# Altium PCB body_2024-07-18.pcbdoc (part 1 of 2)
Units mil, origin at the board's own origin, x right, y up, seen from the top; angles counter-clockwise.
Board outline 1175 x 6265 mil, 4 copper layers (Top Layer, Layer 1, Layer 2, Bottom Layer), stack 23.756 mil thick; 104 components, 187 nets, 571 pads, 148 vias.
Unrouted connection lines stored in the file: 11.
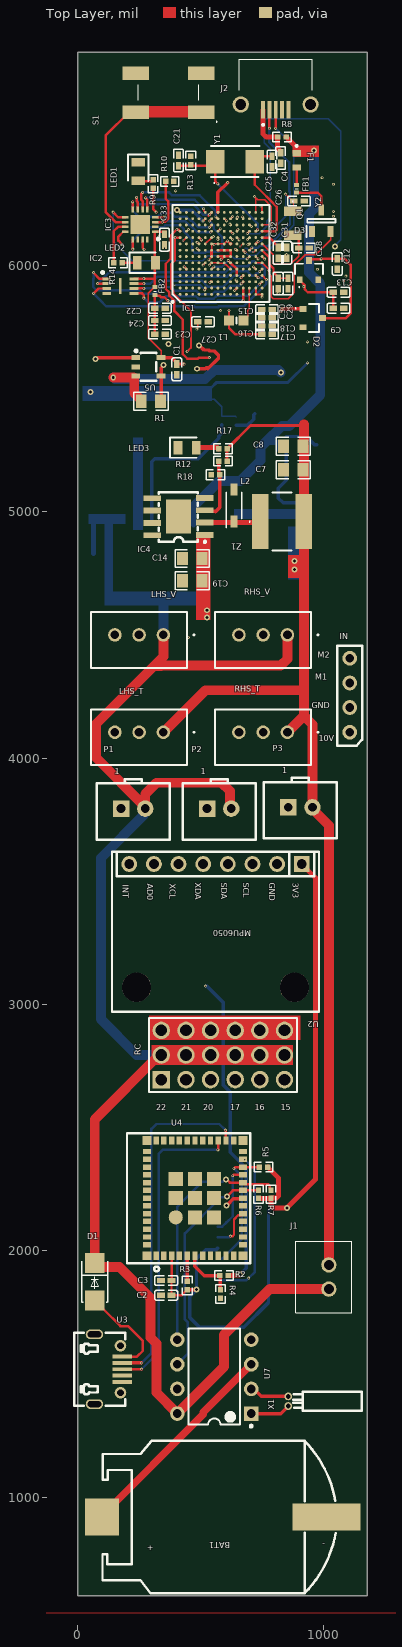
[diagram p0: Top Layer view]
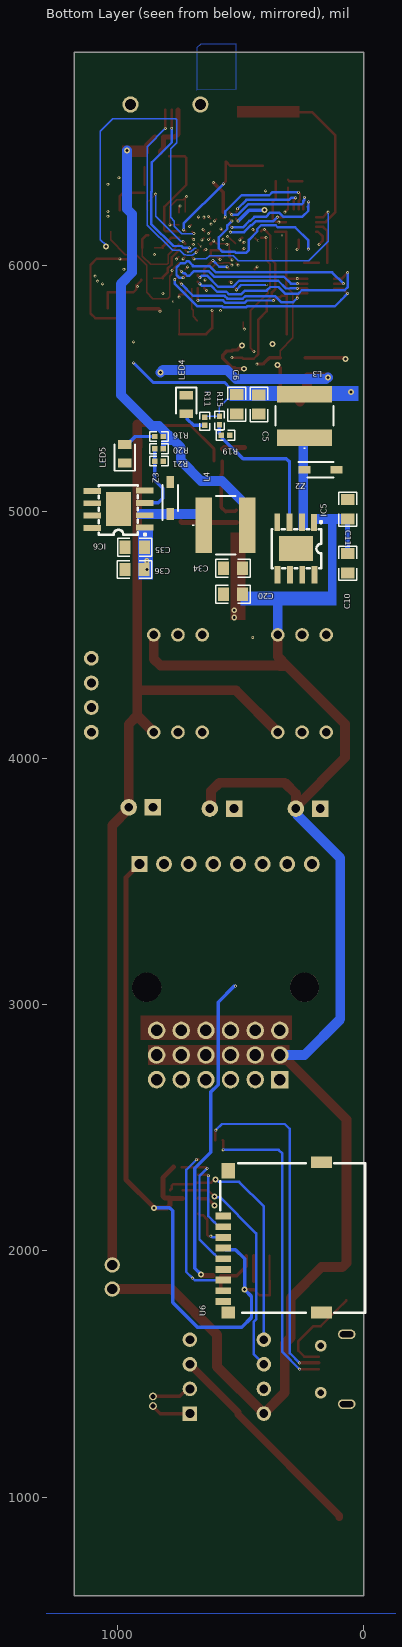
[diagram p1: Bottom Layer view, seen from below]
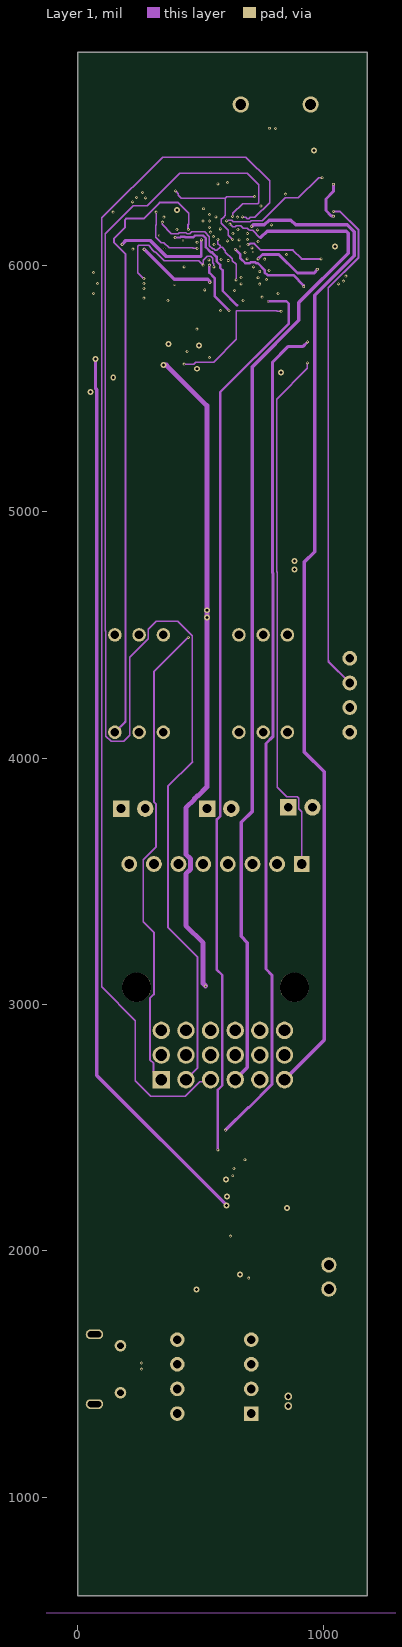
[diagram p2: Layer 1]
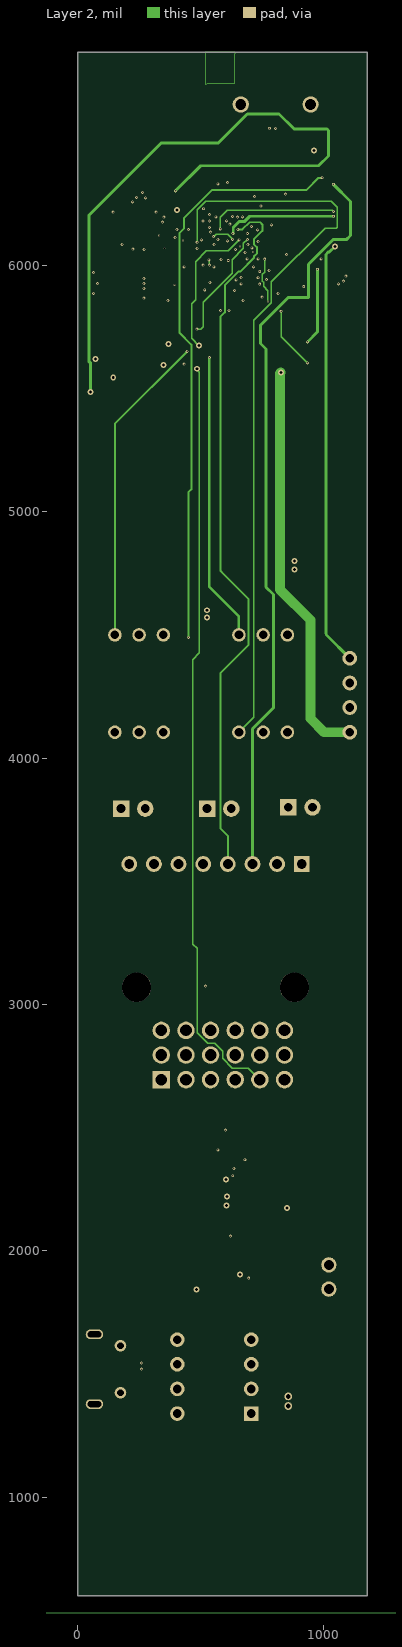
[diagram p3: Layer 2]

## Layer stack, top to bottom
Top Solder: solder mask 0.4, Solder Resist, Dk 3.5
Top Layer: signal copper 1.4
Dielectric 1: prepreg 2.8, PP-006, Dk 4.1
Layer 1: signal copper 1.378
Dielectric1: dielectric 12.6, FR-4, Dk 4.8
Layer 2: signal copper 1.378
Dielectric 2: prepreg 2.8, PP-006, Dk 4.1
Bottom Layer: signal copper 1.4
Bottom Solder: solder mask 0.4, Solder Resist, Dk 3.5

## Board outline
0,5605 0,6865 1175,6865 1175,600 0,600

## Design rules (kind name [scope] priority, off if disabled: settings)
AssemblyTestPointUsage [All] p0: scope1count=1 scope1_0_kind=Board scope1_0_value=Board scope2count=1 scope2_0_kind=Board scope2_0_value=Board commentlength=0
AssemblyTestpoint [All] p0: scope1count=1 scope1_0_kind=Board scope1_0_value=Board scope2count=1 scope2_0_kind=Board scope2_0_value=Board commentlength=0
BoardOutlineClearance [All] p0: scope1count=1 scope1_0_kind=Board scope1_0_value=Board scope2count=1 scope2_0_kind=Board scope2_0_value=Board commentlength=0 gap=10
BoardOutlineClearance [All] p1: gap=10 ignorepadtopadclearanceinfootprint=FALSE except(0: Arc-SplitContinuation Track-SplitContinuation SMDPad-SplitContinuation THPad-SplitContinuation Via-SplitContinuation Fill-SplitContinuation Poly-SplitContinuation Region-SplitContinuation Text-SplitContinuation; 40: Arc-OutlineEdge Track-OutlineEdge SMDPad-OutlineEdge THPad-OutlineEdge Via-OutlineEdge Fill-OutlineEdge Poly-OutlineEdge Region-OutlineEdge Text-OutlineEdge)
Clearance [All] p0: scope1count=1 scope1_0_kind=Board scope1_0_value=Board scope2count=1 scope2_0_kind=Board scope2_0_value=Board commentlength=0 gap=7
Clearance [All] p1: gap=7 ignorepadtopadclearanceinfootprint=FALSE
ComponentClearance [All] p0: scope1count=1 scope1_0_kind=Board scope1_0_value=Board scope2count=1 scope2_0_kind=Board scope2_0_value=Board commentlength=0 gap=10 collisioncheckmode=3
DiffPairsRouting [All] p0: scope1count=1 scope1_0_kind=Board scope1_0_value=Board scope2count=1 scope2_0_kind=Board scope2_0_value=Board commentlength=0
FabricationTestPointUsage [All] p0: scope1count=1 scope1_0_kind=Board scope1_0_value=Board scope2count=1 scope2_0_kind=Board scope2_0_value=Board commentlength=0 valid=0 allowmultiple=FALSE
FabricationTestpoint [All] p0: scope1count=1 scope1_0_kind=Board scope1_0_value=Board scope2count=1 scope2_0_kind=Board scope2_0_value=Board commentlength=0 side=3 testpointundercomponent=TRUE minsize=40 maxsize=100 preferedsize=60 minholesize=0 maxholesize=40 preferedholesize=32 testpointgrid=1
FanoutControl Fanout_BGA [All] p0 off: scope1count=1 scope1_0_kind=Board scope1_0_value=Board scope2count=1 scope2_0_kind=Board scope2_0_value=Board commentlength=69 // Protel DXP Scope 1 Expression Was: IsBGA   Fanout_BGA (Default Rule)
FanoutControl Fanout_LCC [All] p0 off: scope1count=1 scope1_0_kind=Board scope1_0_value=Board scope2count=1 scope2_0_kind=Board scope2_0_value=Board commentlength=69 // Protel DXP Scope 1 Expression Was: IsLCC   Fanout_LCC (Default Rule)
FanoutControl Fanout_SOIC [All] p0 off: scope1count=1 scope1_0_kind=Board scope1_0_value=Board scope2count=1 scope2_0_kind=Board scope2_0_value=Board commentlength=71 // Protel DXP Scope 1 Expression Was: IsSOIC   Fanout_SOIC (Default Rule)
FanoutControl Fanout_Small [All] p0 off: scope1count=1 scope1_0_kind=Board scope1_0_value=Board scope2count=1 scope2_0_kind=Board scope2_0_value=Board commentlength=84 // Protel DXP Scope 1 Expression Was: (CompPinCount < 5)   Fanout_Small (Default Rule)
FanoutControl Fanout_Default [All] p0: scope1count=1 scope1_0_kind=Board scope1_0_value=Board scope2count=1 scope2_0_kind=Board scope2_0_value=Board commentlength=30 // Fanout_Default (Default Rule)
Height [All] p0: scope1count=1 scope1_0_kind=Board scope1_0_value=Board scope2count=1 scope2_0_kind=Board scope2_0_value=Board commentlength=0
HoleSize [All] p0: scope1count=1 scope1_0_kind=Board scope1_0_value=Board scope2count=1 scope2_0_kind=Board scope2_0_value=Board commentlength=0 absolutevalues=TRUE maxlimit=100 minlimit=1 maxpercent=80.000 minpercent=20.000
HoleToHoleClearance [All] p0: scope1count=1 scope1_0_kind=Board scope1_0_value=Board scope2count=1 scope2_0_kind=Board scope2_0_value=Board commentlength=0
LayerPairs [All] p0: scope1count=1 scope1_0_kind=Board scope1_0_value=Board scope2count=1 scope2_0_kind=Board scope2_0_value=Board commentlength=0 enforce=TRUE
MinimumSolderMaskSliver [All] p0: scope1count=1 scope1_0_kind=Board scope1_0_value=Board scope2count=1 scope2_0_kind=Board scope2_0_value=Board commentlength=0
NetAntennae [All] p0: scope1count=1 scope1_0_kind=Board scope1_0_value=Board scope2count=1 scope2_0_kind=Board scope2_0_value=Board commentlength=0
PasteMaskExpansion [All] p0: scope1count=1 scope1_0_kind=Board scope1_0_value=Board scope2count=1 scope2_0_kind=Board scope2_0_value=Board commentlength=0 expansion=0
PlaneClearance [All] p0: scope1count=1 scope1_0_kind=Board scope1_0_value=Board scope2count=1 scope2_0_kind=Board scope2_0_value=Board commentlength=0 clearance=20
PlaneConnect [All] p0: scope1count=1 scope1_0_kind=Board scope1_0_value=Board scope2count=1 scope2_0_kind=Board scope2_0_value=Board commentlength=0 planeconnectstyle=Relief reliefexpansion=20 reliefentries=4 reliefconductorwidth=10 reliefairgap=10
PolygonConnect [All] p0: scope1count=1 scope1_0_kind=Board scope1_0_value=Board scope2count=1 scope2_0_kind=Board scope2_0_value=Board commentlength=0 connectstyle=Direct reliefconductorwidth=10 reliefentries=4 polygonreliefangle="90 Angle"
PolygonConnect [All] p1: connectstyle=Direct reliefconductorwidth=10 reliefentries=4 polygonreliefangle="90 Angle" airgapwidth=10
RoutingCorners [All] p0: scope1count=1 scope1_0_kind=Board scope1_0_value=Board scope2count=1 scope2_0_kind=Board scope2_0_value=Board commentlength=0 cornerstyle=45-Degree minsetback=100 maxsetback=100
RoutingLayers [All] p0: scope1count=1 scope1_0_kind=Board scope1_0_value=Board scope2count=1 scope2_0_kind=Board scope2_0_value=Board commentlength=0 top layer=Automatic mid layer 1=Automatic mid layer 2=Automatic bottom layer=Automatic
RoutingPriority [All] p0: scope1count=1 scope1_0_kind=Board scope1_0_value=Board scope2count=1 scope2_0_kind=Board scope2_0_value=Board commentlength=0
RoutingTopology [All] p0: scope1count=1 scope1_0_kind=Board scope1_0_value=Board scope2count=1 scope2_0_kind=Board scope2_0_value=Board commentlength=0 topology=Shortest
RoutingVias [All] p0: scope1count=1 scope1_0_kind=Board scope1_0_value=Board scope2count=1 scope2_0_kind=Board scope2_0_value=Board commentlength=0 holewidth=6 width=12 viastyle="Through Hole" minholewidth=5 minwidth=8 maxholewidth=12 maxwidth=24
RoutingVias [All] p1: holewidth=6 width=12 viastyle="Through Hole" minholewidth=5 minwidth=8 maxholewidth=12 maxwidth=24
ShortCircuit [All] p0: scope1count=1 scope1_0_kind=Board scope1_0_value=Board scope2count=1 scope2_0_kind=Board scope2_0_value=Board commentlength=0 allowed=FALSE
SilkToBoardRegionClearance [All] p0: scope1count=1 scope1_0_kind=Board scope1_0_value=Board scope2count=1 scope2_0_kind=Board scope2_0_value=Board commentlength=0
SilkToSilkClearance [All] p0: scope1count=1 scope1_0_kind=Board scope1_0_value=Board scope2count=1 scope2_0_kind=Board scope2_0_value=Board commentlength=0
SilkToSolderMaskClearance [All] p0 off: scope1count=1 scope1_0_kind=Board scope1_0_value=Board scope2count=1 scope2_0_kind=Board scope2_0_value=Board commentlength=44 // Protel DXP Scope 1 Expression Was: IsPad
SolderMaskExpansion [All] p0: scope1count=1 scope1_0_kind=Board scope1_0_value=Board scope2count=1 scope2_0_kind=Board scope2_0_value=Board commentlength=0 expansion=4
SolderMaskExpansion [All] p1: expansion=4 istentingtop=FALSE
UnRoutedNet [All] p0: scope1count=1 scope1_0_kind=Board scope1_0_value=Board scope2count=1 scope2_0_kind=Board scope2_0_value=Board commentlength=0
UnpouredPolygon [All] p0: scope1count=1 scope1_0_kind=Board scope1_0_value=Board scope2count=1 scope2_0_kind=Board scope2_0_value=Board commentlength=0
Width [All] p0: scope1count=1 scope1_0_kind=Board scope1_0_value=Board scope2count=1 scope2_0_kind=Board scope2_0_value=Board commentlength=0 maxlimit=100 minlimit=6 preferedwidth=12
Width [All] p1: maxlimit=100 minlimit=6 preferedwidth=12
30 further rules are at their usual default settings.

## Classes and differential pairs
component class Teensy: C4 C9 C12 C13 C15 C16 C17 C18 C21 C22 C23 C24 C25 C26 C27 C28 C29 C30 C31 C32 C33 D2 D3 F1 FB1 FB2 IC1 IC2 IC3 J2 L1 LED1 LED2 Q1 R8 R9 R10 R13 R14 S1 Y1 Y2
component class Buck_converter: C5 C6 C7 C8 C10 C11 C14 C19 C20 C34 C35 C36 IC4 IC5 IC6 L2 L3 L4 LED3 LED4 LED5 R11 R12 R15 R16 R17 R18 R19 R20 R21 Z1 Z2 Z3
component class Sheet_1_2024-07-17: BAT1 C1 C2 C3 D1 IN J1 LHS_T LHS_V P1 P2 P3 R1 R2 R3 R4 R5 R6 R7 RC RHS_T RHS_V U2 U3 U4 U5 U6 U7 X1

## Components (designator, comment, footprint, x,y, rotation, side; value= is the part's Value field where it differs from the comment)
BAT1 "BS-CR2032-8" BAT-SMD_BS-CR2032-8 555,920 r180 top
C1 "0402B104K250CT" C0402#1 403.04,5577.64 r90 top
C2 "0402B104K250CT" C0402#2 360,1820 r0 top
C3 "0402X106M6R3NT" C0402#2 360,1880 r180 top
C4 "Cap" C0402#1 824.32,6435.41 r90 top
C5 "C1711" C0805 425,5435 r90 bottom
C6 "C86816" C0805 515,5435.63 r90 bottom
C7 "C1711" C0805 875,5170 r0 top
C8 "C86816" C0805 875,5265 r0 top
C9 "Cap" C0402#1 1059.32,5825.41 r180 top
C10 "C1711" C0805 65,4790 r90 bottom
C11 "C86816" C0805 65,5010 r270 bottom
C12 "Cap" C0402#1 1054.32,6005.41 r90 top
C13 "Cap" C0402#1 1059.32,5890.41 r180 top
C14 "C1711" C0805 465,4810 r0 top
C15 "Cap" C0402#1 769.32,5820.41 r180 top
C16 "Cap" C0402#1 769.32,5787.08 r180 top
C17 "Cap" C0402#1 769.32,5753.74 r180 top
C18 "Cap" C0402#1 769.32,5720.41 r180 top
C19 "C86816" C0805 465,4720 r0 top
C20 "C1711" C0805 530,4665 r180 bottom
C21 "Cap" C0402#1 409.32,6425.41 r270 top
C22 "Cap" C0402#1 334.32,5825.41 r180 top
C23 "Cap" C0402#1 334.32,5720.41 r180 top
C24 "Cap" C0402#1 334.32,5775.41 r180 top
C25 "Cap" C0402#1 789.32,6420.41 r90 top
C26 "Cap" C0402#1 899.32,6260.41 r180 top
C27 "Cap" C0402#1 509.32,5770.41 r180 top
C28 "Cap" C0402#1 919.32,6070.41 r180 top
C29 "Cap" C0402#1 854.32,5925.41 r90 top
C30 "Cap" C0402#1 814.32,5925.41 r90 top
C31 "Cap" C0402#1 849.32,6050.41 r90 top
C32 "Cap" C0402#1 814.32,6050.41 r90 top
C33 "Cap" C0402#1 353.04,6103.74 r270 top
C34 "C86816" C0805 530,4770 r180 bottom
C35 "C1711" C0805 929.37,4855 r180 bottom
C36 "C86816" C0805 930,4765 r180 bottom
D1 "SS34-MS" DO-214AC_L4.3-W2.7-LS5.0-RD 70,1875 r270 top
D2 "BAT54C,215" BAT54C215 954.32,5785.41 r270 top
D3 "BAT54C,215" BAT54C215 939.32,5980.41 r0 top
F1 "ERB-RE0R50V" ERBRE0R50V 889.32,6425.41 r270 top
FB1 "BLM15AG601SN1D" NFZ15SG152SN10B 889.32,6310.41 r270 top
FB2 "BLM15AG601SN1D" NFZ15SG152SN10B 314.32,5895.41 r90 top
IC1 "MIMXRT1062DVL6B" BGA196C65P14X14_1000X1000X152 582.71,6048.21 r90 top
IC2 "W25Q16JVUXIM" SON50P300X200X60-9N 174.32,5915.41 r0 top
IC3 "MKL02Z32VFG4" QFN50P300X300X65-17N-D 254.32,6165.41 r180 top
IC4 "LM2596HVGDP-ADJ" SOP-8-PP_L4.9-W3.9-P1.27-LS6.0-BL-EP 410,4980 r90 top
IC5 "LM2596HVGDP-ADJ" SOP-8-PP_L4.9-W3.9-P1.27-LS6.0-BL-EP 275,4850.01 r0 bottom
IC6 "LM2596HVGDP-ADJ" SOP-8-PP_L4.9-W3.9-P1.27-LS6.0-BL-EP 994.99,5010 r90 bottom
IN "ESC Input" PINS1X4 1105,4255 r90 top
J1 "B2B-XH-2__LF__SN_" B2BXH2LFSN 1020,1845 r90 top
J2 "U-F-M5WD-W-1" UFM5WDW1 804.32,6595.41 r0 top
L1 "CBMF1608T4R7M" INDC1608X100N 644.32,5775.41 r180 top
L2 "SWPA6045S680MT" SWPA6045S680MT 830,4960 r0 top
L3 "SWPA6045S680MT" SWPA6045S680MT 240,5388.58 r90 bottom
L4 "SWPA6045S680MT" SWPA6045S680MT 560,4945 r180 bottom
LED1 "150080BS75000" LEDC2012X80N 246.92,6380.41 r270 top
LED2 "150080BS75000" LEDC2012X80N 279.32,6010.41 r0 top
LED3 "150080BS75000" LEDC2012X80N 445,5260 r0 top
LED4 "150080BS75000" LEDC2012X80N 720,5435 r270 bottom
LED5 "150080BS75000" LEDC2012X80N 970,5235 r90 bottom
LHS_T "B3B-XH-A_LF__SN_" B3BXHALFSN 348.43,4105 r180 top
LHS_V "B3B-XH-A_LF__SN_" B3BXHALFSN 348.43,4500 r180 top
P1 "C18185649" HDR-TH_2P-P2.50-V-F-1 225.79,3795 r0 top
P2 "C18185649" HDR-TH_2P-P2.50-V-F-1 575,3795 r0 top
P3 "C18185649" HDR-TH_2P-P2.50-V-F-1 904.21,3800 r0 top
Q1 "DMG2305UX" SOT96P240X115-3N 989.32,6180.41 r90 top
R1 "RLM10FTSMR006" R0805 298.04,5447.64 r0 top
R2 "SCR0402F10K" R0402#1 595,1900 r0 top
R3 "SCR0402F10K" R0402#1 445,1860 r270 top
R4 "RMC04022K1%N" R0402#1 580,1825 r90 top
R5 "SCR0402F10K" R0402#1 755,2340 r0 top
R6 "SCR0402F10K" R0402#1 735,2230 r270 top
R7 "SCR0402F10K" R0402#1 785,2230 r270 top
R8 "Res1" R0402#2 829.32,6520.41 r0 top
R9 "Res1" R0402#2 306.92,6330.41 r270 top
R10 "Res1" R0402#2 374.32,6340.41 r180 top
R11 "1k" R0402#2 645,5367.04 r90 bottom
R12 "29.15k" R0402#2 590,5205 r180 top
R13 "Res1" R0402#2 459.32,6425.41 r270 top
R14 "Res1" R0402#2 164.32,6010.41 r0 top
R15 "3.4K" R0402#2 585,5370 r270 bottom
R16 "1k" R0402#2 830,5305 r180 bottom
R17 "1k" R0402#2 590,5255 r0 top
R18 "5k" R0402#2 560,5150 r0 top
R19 "2K" R0402#2 560,5310 r180 bottom
R20 "3K" R0402#2 830,5255 r0 bottom
R21 "1k" R0402#2 830,5205 r0 bottom
RC "Receiver" HEADER_PINS_3X6_2.54MM 340,2695 r90 top
RHS_T "B3B-XH-A_LF__SN_" B3BXHALFSN 851.85,4105 r180 top
RHS_V "B3B-XH-A_LF__SN_" B3BXHALFSN 851.85,4500 r180 top
S1 "SKHUBHE010" SKHUBHE010 369.32,6700.41 r180 top
U2 "MPU6050 MODULE" MPU6050 750,3270 r180 top
U3 "HX MICRO XNJ JB" MICRO-USB-SMD_MICRONJ5P-1.0-1.25 125,1520 r270 top
U4 "ESP32-C3-MINI-1U-H4" WIFIM-SMD_ESP32-C3-MINI-MINI-1U 476.5,2214.24 r90 top
U5 "ZXCT1086E5TA" SOT-25_L3.0-W1.6-P0.95-LS2.8-BR 288.04,5587.64 r180 top
U6 "HX TF-CARD H1.8" TF-SMD_HX-TF-CARD-H1.8 370,2055 r90 bottom
U7 "DS1307N" DIP-8_L9.8-W6.6-P2.54-LS7.6-BL 555,1490 r90 top
X1 "DT-26 32.768KHz" OSC-TH_BD2.0-P0.70-D0.3 855,1390 r180 top
Y1 "ABM3-24.000MHZ-D2Y-T" ABM3 639.32,6420.41 r0 top
Y2 "Q13FC1350000300" Q13FC1350000300 874.32,6170.41 r270 top
Z1 "BZT52C10" SOD3716X125N 635,5025 r90 top
Z2 "BZT52C10" SOD3716X125N 175,5170 r180 bottom
Z3 "BZT52C10" SOD3716X125N 785,5055 r90 bottom

## Footprints (in the part's own frame and the unit in brackets; to place one, negate y for a bottom-side part, rotate by r counter-clockwise, add the part's x,y. Pads: shape width x height; smd on the part's side, far side on the other; paste and mask are expansions set on the pad)
ABM3 [mm]
  rect 1.9x2.4 smd: 1(-2.05,0) 2(2.05,0)
  silkscreen extent -2.5,-2.25 2.5,1.6
B2BXH2LFSN [mm]
  round 1.575 hole 1.05: 1(0,0) 2(2.5,0)
  silkscreen extent -2.45,-2.35 4.95,3.4
B3BXHALFSN [mm]
  round 1.4 hole 0.9: 1(0,0) 2(2.5,0) 3(5,0)
  silkscreen extent -3.2,-2.35 7.45,3.4
BAT54C215 [mm]
  rect 0.6x0.7 smd: 1(-0.95,-1) 2(0.95,-1) 3(0,1)
  silkscreen extent -1.45,-1.8 1.45,0.65
BAT-SMD_BS-CR2032-8 [mm]
  rect 7x2.8 smd: 1(-11.575,0)
  rect 3.5x3.8 smd: 2(11.575,0)
  silkscreen extent -12.52,-7.85 11.52,7.85
BGA196C65P14X14_1000X1000X152 [mm]
  round 0.29 smd: A1(-4.225,4.225) A2(-3.575,4.225) A3(-2.925,4.225) A4(-2.275,4.225) A5(-1.625,4.225) A6(-0.975,4.225) A7(-0.325,4.225) A8(0.325,4.225) A9(0.975,4.225) A10(1.625,4.225) A11(2.275,4.225) A12(2.925,4.225) A13(3.575,4.225) A14(4.225,4.225) B1(-4.225,3.575) B2(-3.575,3.575) B3(-2.925,3.575) B4(-2.275,3.575) B5(-1.625,3.575) B6(-0.975,3.575) B7(-0.325,3.575) B8(0.325,3.575) B9(0.975,3.575) B10(1.625,3.575) B11(2.275,3.575) B12(2.925,3.575) B13(3.575,3.575) B14(4.225,3.575) C1(-4.225,2.925) C2(-3.575,2.925) C3(-2.925,2.925) C4(-2.275,2.925) C5(-1.625,2.925) C6(-0.975,2.925) C7(-0.325,2.925) C8(0.325,2.925) C9(0.975,2.925) C10(1.625,2.925) C11(2.275,2.925) C12(2.925,2.925) C13(3.575,2.925) C14(4.225,2.925) D1(-4.225,2.275) D2(-3.575,2.275) D3(-2.925,2.275) D4(-2.275,2.275) D5(-1.625,2.275) D6(-0.975,2.275) D7(-0.325,2.275) D8(0.325,2.275) D9(0.975,2.275) D10(1.625,2.275) D11(2.275,2.275) D12(2.925,2.275) D13(3.575,2.275) D14(4.225,2.275) E1(-4.225,1.625) E2(-3.575,1.625) E3(-2.925,1.625) E4(-2.275,1.625) E5(-1.625,1.625) E6(-0.975,1.625) E7(-0.325,1.625) E8(0.325,1.625) E9(0.975,1.625) E10(1.625,1.625) E11(2.275,1.625) E12(2.925,1.625) E13(3.575,1.625) E14(4.225,1.625) F1(-4.225,0.975) F2(-3.575,0.975) F3(-2.925,0.975) F4(-2.275,0.975) F5(-1.625,0.975) F6(-0.975,0.975) F7(-0.325,0.975) F8(0.325,0.975) F9(0.975,0.975) F10(1.625,0.975) F11(2.275,0.975) F12(2.925,0.975) F13(3.575,0.975) F14(4.225,0.975) G1(-4.225,0.325) G2(-3.575,0.325) G3(-2.925,0.325) G4(-2.275,0.325) G5(-1.625,0.325) G6(-0.975,0.325) G7(-0.325,0.325) G8(0.325,0.325) G9(0.975,0.325) G10(1.625,0.325) G11(2.275,0.325) G12(2.925,0.325) G13(3.575,0.325) G14(4.225,0.325) H1(-4.225,-0.325) H2(-3.575,-0.325) H3(-2.925,-0.325) H4(-2.275,-0.325) H5(-1.625,-0.325) H6(-0.975,-0.325) H7(-0.325,-0.325) H8(0.325,-0.325) H9(0.975,-0.325) H10(1.625,-0.325) H11(2.275,-0.325) H12(2.925,-0.325) H13(3.575,-0.325) H14(4.225,-0.325) J1(-4.225,-0.975) J2(-3.575,-0.975) J3(-2.925,-0.975) J4(-2.275,-0.975) J5(-1.625,-0.975) J6(-0.975,-0.975) J7(-0.325,-0.975) J8(0.325,-0.975) J9(0.975,-0.975) J10(1.625,-0.975) J11(2.275,-0.975) J12(2.925,-0.975) J13(3.575,-0.975) J14(4.225,-0.975) K1(-4.225,-1.625) K2(-3.575,-1.625) K3(-2.925,-1.625) K4(-2.275,-1.625) K5(-1.625,-1.625) K6(-0.975,-1.625) K7(-0.325,-1.625) K8(0.325,-1.625) K9(0.975,-1.625) K10(1.625,-1.625) K11(2.275,-1.625) K12(2.925,-1.625) K13(3.575,-1.625) K14(4.225,-1.625) L1(-4.225,-2.275) L2(-3.575,-2.275) L3(-2.925,-2.275) L4(-2.275,-2.275) L5(-1.625,-2.275) L6(-0.975,-2.275) L7(-0.325,-2.275) L8(0.325,-2.275) L9(0.975,-2.275) L10(1.625,-2.275) L11(2.275,-2.275) L12(2.925,-2.275) L13(3.575,-2.275) L14(4.225,-2.275) M1(-4.225,-2.925) M2(-3.575,-2.925) M3(-2.925,-2.925) M4(-2.275,-2.925) M5(-1.625,-2.925) M6(-0.975,-2.925) M7(-0.325,-2.925) M8(0.325,-2.925) M9(0.975,-2.925) M10(1.625,-2.925) M11(2.275,-2.925) M12(2.925,-2.925) M13(3.575,-2.925) M14(4.225,-2.925) N1(-4.225,-3.575) N2(-3.575,-3.575) N3(-2.925,-3.575) N4(-2.275,-3.575) N5(-1.625,-3.575) N6(-0.975,-3.575) N7(-0.325,-3.575) N8(0.325,-3.575) N9(0.975,-3.575) N10(1.625,-3.575) N11(2.275,-3.575) N12(2.925,-3.575) N13(3.575,-3.575) N14(4.225,-3.575) P1(-4.225,-4.225) P2(-3.575,-4.225) P3(-2.925,-4.225) P4(-2.275,-4.225) P5(-1.625,-4.225) P6(-0.975,-4.225) P7(-0.325,-4.225) P8(0.325,-4.225) P9(0.975,-4.225) P10(1.625,-4.225) P11(2.275,-4.225) P12(2.925,-4.225) P13(3.575,-4.225) P14(4.225,-4.225)
  silkscreen extent -5.1,-5 5,5.1
C0402#1 [mm]
  rect 0.79x0.54 smd paste-100 mask+0.051: 1(-0.545,0) 2(0.545,0)
  silkscreen extent -1.17,-0.5 1.17,0.5
C0402#2 [mm]
  rect 0.79x0.54 smd paste-100 mask+0: 1(-0.545,0) 2(0.545,0)
  silkscreen extent -1.17,-0.5 1.17,0.5
C0805 [mm]
  rect 1.133x1.377 smd paste-100 mask+0.051: 1(-1,0) 2(1,0)
  silkscreen extent -1.76,-0.92 1.76,0.92
DIP-8_L9.8-W6.6-P2.54-LS7.6-BL [mm]
  rect 1.5x1.5 hole 0.9 paste+0 mask+0: 1(-3.81,-3.81)
  round 1.5 hole 0.9 paste+0 mask+0: 2(-1.27,-3.81) 3(1.27,-3.81) 4(3.81,-3.81) 5(3.81,3.81) 6(1.27,3.81) 7(-1.27,3.81) 8(-3.81,3.81)
  silkscreen extent -5.23,-3.93 4.96,2.65
DO-214AC_L4.3-W2.7-LS5.0-RD [mm]
  rect 2.07x2.06 smd paste+0 mask+0: 1(-1.929,0) 2(1.929,0)
  silkscreen extent -2.13,-1.35 2.14,1.36
ERBRE0R50V [mm]
  rect 0.65x0.9 smd: 1(-0.725,0) 2(0.725,0)
  silkscreen extent -1.6,-0.1 -1.4,0.1
HDR-TH_2P-P2.50-V-F-1 [mm]
  rect 1.7x1.7 hole 0.9: 1(-1.25,0)
  round 1.7 hole 0.9: 2(1.25,0)
  silkscreen extent -3.75,-3.2 3.75,3.05
HEADER_PINS_3X6_2.54MM [mm]
  rect 1.8x1.8 hole 1.2 paste+0 mask+0: 1(0,0)
  round 1.8 hole 1.2 paste+0 mask+0: 2(0,-2.54) 3(0,-5.08) 4(0,-7.62) 5(0,-10.16) 6(0,-12.7) 9(2.54,-2.54) 9(2.54,0) 9(2.54,-7.62) 9(2.54,-5.08) 9(2.54,-12.7) 9(2.54,-10.16) 10(5.08,-5.08) 10(5.08,-2.54) 10(5.08,0) 10(5.08,-12.7) 10(5.08,-10.16) 10(5.08,-7.62)
  silkscreen extent -1.27,-13.97 6.35,1.27
INDC1608X100N [mm]
  rect 1.05x1 smd: 1(-0.75,0) 2(0.75,0)
  silkscreen extent 0,-0.3 0,0.3
LEDC2012X80N [mm]
  rect 0.9x1.4 smd: 1(-0.95,0) 2(0.95,0)
  silkscreen extent -1.75,-1.05 0.95,1.05
MICRO-USB-SMD_MICRONJ5P-1.0-1.25 [mm]
  rect 0.4x2 smd paste-100 mask+0: 1(-1.3,1.427) 2(-0.65,1.427) 3(0,1.427) 4(0.65,1.427) 5(1.3,1.427)
  round 1.2 hole 0.7 paste+0 mask+0: 6(2.425,1.252) 9(-2.425,1.252)
  oval 1x1.8 hole 0.6 slot 1.4 at 90 deg paste+0 mask+0: 7(3.6,-1.428) 8(-3.6,-1.428)
  silkscreen extent -3.75,-3.53 3.75,1.74
MPU6050 [mil]
  rect 64.3x64.3 hole 40.2 paste+0 mask+0: 1(-160,-300)
  round 64.3 hole 40.2 paste+0 mask+0: 2(-60,-300) 3(40,-300) 4(140,-300) 5(240,-300) 6(340,-300) 7(440,-300) 8(540,-300)
  round 118.11 hole 118.11 unplated paste+0 mask+0: ""(-130,200) ""(510,200)
  silkscreen extent -230,-350 610,300
NFZ15SG152SN10B [mm]
  rect 0.4x0.5 smd: 1(-0.4,0) 2(0.4,0)
  silkscreen extent 0,-0.15 0,0.15
OSC-TH_BD2.0-P0.70-D0.3 [mm]
  round 0.8 hole 0.5 paste+0 mask+0: 1(0,0.5) 2(0,-0.5)
  silkscreen extent -7.6,-1 -0.54,1
PINS1X4 [mil]
  round 60 hole 36 paste+0 mask+0: 1(-150,0) 2(-50,0) 3(50,0) 4(150,0)
  silkscreen extent -205,-50 200,50
Q13FC1350000300 [mm]
  rect 1x1.8 smd: 1(-1.25,0) 2(1.25,0)
  silkscreen extent -2.3,-0.05 -2.2,0.05
QFN50P300X300X65-17N-D [mm]
  rect 0.65x0.25 smd: 1(-1.55,0.75) 2(-1.55,0.25) 3(-1.55,-0.25) 4(-1.55,-0.75) 9(1.55,-0.75) 10(1.55,-0.25) 11(1.55,0.25) 12(1.55,0.75)
  rect 0.25x0.65 smd: 5(-0.75,-1.55) 6(-0.25,-1.55) 7(0.25,-1.55) 8(0.75,-1.55) 13(0.75,1.55) 14(0.25,1.55) 15(-0.25,1.55) 16(-0.75,1.55)
  rect 2x2 smd: 17(0,0)
  silkscreen extent -2,1.38 -1.75,1.62
R0402#1 [mm]
  rect 0.566x0.54 smd paste-100 mask+0: 1(-0.433,0) 2(0.433,0)
  silkscreen extent -0.94,-0.5 0.94,0.5
R0402#2 [mm]
  rect 0.566x0.54 smd paste-100 mask+0.051: 1(-0.433,0) 2(0.433,0)
  silkscreen extent -0.94,-0.5 0.94,0.5
R0805 [mm]
  rect 1.133x1.377 smd paste-100 mask+0.051: 1(-1,0) 2(1,0)
  silkscreen extent -1.76,-0.92 1.76,0.92
SKHUBHE010 [mm]
  rect 2.75x1.4 smd: 1(-3.375,2) 2(3.375,2) 3(-3.375,-2) 4(3.375,-2)
  silkscreen extent -5,-0.8 3.1,3.05
SOD3716X125N [mm]
  rect 1.25x0.75 smd: 1(-1.65,0) 2(1.65,0)
  silkscreen extent -2.27,-0.8 1.35,0.8
SON50P300X200X60-9N [mm]
  rect 0.9x0.3 smd: 1(-1.4,0.75) 2(-1.4,0.25) 3(-1.4,-0.25) 4(-1.4,-0.75) 5(1.4,-0.75) 6(1.4,-0.25) 7(1.4,0.25) 8(1.4,0.75)
  rect 0.25x1.65 smd: 9(0,0)
  silkscreen extent -1.97,1.28 -1.72,1.52
SOP-8-PP_L4.9-W3.9-P1.27-LS6.0-BL-EP [mm]
  rect 0.6x1.8 smd paste+0 mask+0.051: 1(-1.883,-2.692) 2(-0.616,-2.7) 3(0.654,-2.7) 4(1.924,-2.7) 5(1.886,2.7) 6(0.616,2.7) 7(-0.654,2.7) 8(-1.924,2.7)
  rect 3.5x2.6 smd paste+0 mask+0.051: 9(0,0)
  silkscreen extent -2.7,-2.83 2.49,2.04
SOT96P240X115-3N [mm]
  rect 1.15x0.6 smd: 1(-1.1,0.96) 2(-1.1,-0.96) 3(1.1,0)
  silkscreen extent -1.68,-1.45 0.18,1.51
SOT-25_L3.0-W1.6-P0.95-LS2.8-BR [mm]
  rect 0.9x0.5 smd paste+0 mask+0.051: 1(1.3,-0.95) 2(1.3,0) 3(1.3,0.95) 4(-1.3,0.95) 5(-1.3,-0.95)
  silkscreen extent -0.8,-1.78 1.4,1.45
SWPA6045S680MT [mm]
  rect 1.7x5.7 smd: 1(-2.25,0) 2(2.25,0)
  silkscreen extent -3.4,-3 1,3
TF-SMD_HX-TF-CARD-H1.8 [mm]
  rect 0.7x1.6 smd paste+0 mask+0: 1(2.2,5.05) 2(1.1,5.05) 3(0,5.05) 4(-1.1,5.05) 5(-2.2,5.05) 6(-3.3,5.05) 7(-4.4,5.05) 8(-5.5,5.05) 9(-6.6,5.05)
  rect 1.2x1.4 smd paste+0 mask+0: 10(-7.75,4.55)
  rect 1.6x1.4 smd paste+0 mask+0: 11(6.85,4.55)
  rect 1.2x2.2 smd paste+0 mask+0: 12(-7.75,-5.05) 13(7.75,-5.05)
  silkscreen extent -7.75,-9.58 7.65,5.4
UFM5WDW1 [mm]
  rect 0.4x1.8 smd: 1(-1.3,0.9) 2(-0.65,0.9) 3(0,0.9) 4(0.65,0.9) 5(1.3,0.9)
  round 1.68 hole 1.12: MH1(-3.6,1.45) MH2(3.6,1.45)
  silkscreen extent -3.75,-0.75 3.75,6.1
WIFIM-SMD_ESP32-C3-MINI-MINI-1U [mm]
  rect 0.85x0.55 smd paste+0 mask+0: 1(-5.95,4) 2(-5.95,3.2) 3(-5.95,2.4) 4(-5.95,1.6) 5(-5.95,0.8) 6(-5.95,0) 7(-5.95,-0.8) 8(-5.95,-1.6) 9(-5.95,-2.4) 10(-5.95,-3.2) 11(-5.95,-4) 25(5.95,-4) 26(5.95,-3.2) 27(5.95,-2.4) 28(5.95,-1.6) 29(5.95,-0.8) 30(5.95,0) 31(5.95,0.8) 32(5.95,1.6) 33(5.95,2.4) 34(5.95,3.2) 35(5.95,4)
  rect 0.55x0.85 smd paste+0 mask+0: 12(-4.8,-4.95) 13(-4,-4.95) 14(-3.2,-4.95) 15(-2.4,-4.95) 16(-1.6,-4.95) 17(-0.8,-4.95) 18(0,-4.95) 19(0.8,-4.95) 20(1.6,-4.95) 21(2.4,-4.95) 22(3.2,-4.95) 23(4,-4.95) 24(4.8,-4.95) 36(4.8,4.95) 37(4,4.95) 38(3.2,4.95) 39(2.4,4.95) 40(1.6,4.95) 41(0.8,4.95) 42(0,4.95) 43(-0.8,4.95) 44(-1.6,4.95) 45(-2.4,4.95) 46(-3.2,4.95) 47(-4,4.95) 48(-4.8,4.95)
  rect 1.45x1.45 smd paste+0 mask+0: 49(0,0) 54(-1.975,0) 56(0,1.975) 57(1.975,1.975) 58(1.975,0) 59(-1.975,-1.975) 60(0,-1.975) 61(1.975,-1.975)
  rect 0.9x0.9 smd paste+0 mask+0: 50(5.95,4.95) 51(5.95,-4.95) 52(-5.95,-4.95) 53(-5.95,4.95)
  round 1.45 smd: 55(-1.975,1.975)
  silkscreen extent -7.55,-5.7 6.7,7

## Part data
C4 C9 C12 C13 C15 C16 C17 C18 C21 C22 C23 C24 C25 C26 C27 C28 C29 C30 C31 C32 C33: "Capacitor"
C5 C6 C7 C8 C10 C11 C14 C19 C20 C34 C35 C36: library part Cap, "Capacitor"
D2 D3: "Schottky Diode"
F1: "Fuse"
FB1 FB2: "Ferrite Bead"
IC1 IC2 IC3 IC4 IC5 IC6: "Integrated Circuit"
J1 J2 LHS_T LHS_V RHS_T RHS_V: "Connector"
L1 L2 L3 L4: "Inductor"
LED1 LED2 LED3 LED4 LED5: "LED"
P1 P2 P3: library part WJ500V-5.08-2P
Q1: "MOSFET (P-Channel)"
R8 R9 R10 R13 R14: "Resistor"
R12 R15 R18 R19 R20 R21: library part 10k
S1: "Switch"
Y1 Y2: "Crystal or Oscillator"
Z1 Z2 Z3: "Zener Diode"

## Via types
v1: diameter 12, hole 6, Top Layer to Bottom Layer, 120 vias
v2: diameter 24, hole 12, Top Layer to Bottom Layer, 21 vias
v3: diameter 8, hole 5, Top Layer to Bottom Layer, 7 vias

## Nets (pads, with @x,y where several pads share a name; then routed paths per layer and width w, separated by ;. In a path a pad name is that pad's centre, name@x,y a point inside that pad or via, vN(x,y) a via of type N, cw(c..) or ccw(c..) an arc to the next point about the centre after c; other vN are vias at no path point)
3.3V: C1.2 C2.2 C3.1 C5.2 C6.2 C33.1 D2.1 FB2.2 IC1.E6 IC1.E9 IC1.F5 IC1.F10 IC1.J6 IC1.J10 IC1.K4 IC1.K5 IC1.N14 IC1.P12 IC2.8 IC3.1 L3.2 LED2.2 R3.2 R5.2 R6.2 R7.2 R11.2 R15.1 U2.1 U4.3 U5.5 U6.4 | length 12037.2
  Top Layer w6: FB2.2@314.32,5911.16 312.35,5911.16 287.31,5886.12 287.31,5705.64 339.22,5653.73 U5.5@339.22,5625.04 ; v1(509.32,6000.41) IC1.E6@518.73,6009.82 ; IC1.E9@518.73,6086.59 IC1.F10@544.32,6112.18 IC1.F10@545.79,6112.18 ; IC1.F5@544.32,5984.23 v1(553.76,5993.67) v1@554.32,5994.23 ; IC1.J10@621.09,6112.18 621.6,6112.18 629,6104.79 v1(629.5,6104.79) ; v1(718.57,6278.3) 724.32,6272.54 724.32,6270.41 723.46,6269.55 IC1.N14@723.46,6214.55 ; 725.39,6271.48 731.45,6265.41 759.32,6265.41 786.37,6238.36 v1(786.37,6163.36) IC1.P12@749.05,6163.36
  Top Layer w10: IC2.8@229.44,5944.94 268.85,5944.94 v1(269.32,5945.41) 314.32,5945.41 ; FB2.2@314.32,5911.16 314.32,5945.41 ; 314.32,6051.85 314.32,5945.41 ; 314.32,6053.36 314.32,6135.81 314.4,6135.88 IC3.1@315.35,6135.88 C33.1@358.69,6135.88 ; U4.3@382.01,1980 382.01,1880.55 C3.1@381.46,1880 C2.2@381.46,1820 422.55,1820 445,1842.45 R3.2@445,1842.96 ; v1(611.66,6019.26) IC1.J6@621.09,6009.82 IC1.K5@646.69,5984.23 IC1.K4@646.69,5958.64
  Top Layer w12: C1.2@403.04,5604.02 403.04,5602.95 407.67,5598.32 v1(433,5598.32)
  Top Layer w14: U5.5@339.22,5625.04 382.02,5625.04 C1.2@403.04,5604.02 ; R3.2@445,1842.96 v2(482.96,1842.96) ; v1(826.39,5813.34) 826.39,5817.48 831.72,5822.81 D2.1@914.95,5822.81
  Top Layer w20: R6.2@735,2212.96 R7.2@785,2212.96 786.66,2214.62 806.8,2214.62 815,2222.83 815,2297.04 R5.2@778.18,2333.86 ; R5.2@772.04,2340 R5.2@772.55,2340 ; R7.2@789.66,2211.48 785,2206.82 785,2186.82 796.82,2175 v2(850,2175) 965,2290 965,3515 U2.1@910,3570
  Layer 1 w6: v1(269.32,5945.41) 245.32,5969.41 245.32,6077.9 248.84,6081.41 288.59,6081.41 302.27,6067.73 302.27,6064.44 313.36,6053.36 ; 315,6055 351.59,6018.41 491.32,6018.41 v1(509.32,6000.41) 509.32,6020.02 526.76,6037.45 540.01,6037.45 549.71,6027.76 549.71,6009.8 552.61,6006.9 552.61,5994.81 v1(553.76,5993.67) ; v1(398.04,6302.06) 409.68,6290.42 409.68,6283.04 420.17,6272.54 599.32,6272.54 ; v1(433,5598.32) 471.21,5598.32 479.89,5607 552,5607 644.32,5699.32 644.32,5815.41 808.39,5815.41 810.46,5813.34 v1(826.39,5813.34) ; v1(629.5,6104.79) 628.49,6104.79 611.85,6121.43 611.85,6142.88 584.32,6170.41 584.32,6186.24 592.48,6194.4 592.48,6195.4 599.32,6202.24 599.32,6272.54 ; v1(718.57,6278.3) 605.08,6278.3 599.32,6272.54 ; U2.1@910,3570 910,3781.95 898.46,3793.48 898.46,3837.6 892.6,3843.46 848.49,3843.46 810,3881.95 810,4755.09 808,4757.09 808,5456.89 933.04,5581.93 v1(933.04,5603.74)
  Layer 2 w6: v1(551.58,6115.9) 553.2,6115.9 562.71,6125.41 609.71,6125.41 629.5,6105.62 v1(629.5,6104.79) ; v1(826.39,5813.34) 826.39,5710.39 v1(933.04,5603.74)
  Layer 2 w12: v2@52,5490.54 52,5604.42 46,5610.42 46,6201.69 341.04,6496.74 571.98,6496.74 688.98,6613.74 818.04,6613.74 878.04,6553.74 1011.01,6553.74 1018.04,6546.71 1018.04,6443.74 978.04,6403.74 499.71,6403.74 v1(398.04,6302.06)
  Bottom Layer w6: C6.2@515,5475 534.29,5455.71 554.29,5455.71 585,5425 R15.1@585,5387.04 642.04,5387.04 R11.2@645,5384.08
  Bottom Layer w10: v1(553.76,5993.67) 586.07,5993.67 v1(611.66,6019.26)
  Bottom Layer w12: C6.2@515,5475 515,5480 539,5504 544,5504 565,5525 854.31,5525 v1(933.04,5603.74)
  Bottom Layer w14: U6.4@568.81,2011.7 562.03,2004.92 519.92,2004.92 482.96,1967.96 v2(482.96,1842.96) 455,1815 455,1730 495,1690 674.32,1690 775,1790.68 775,2162.29 787.71,2175 v2(850,2175)
  other v2: 52,5485
8.4V: C7.2 C8.2 C35.2 C36.2 IC6.1 J1.2 L2.2 LHS_T.1 P3.2 R12.1 R17.2 RHS_T.1 | length 4591.5
  Top Layer w12: R12.1@607.04,5205 R17.2@607.04,5255 607.55,5255 702.55,5350 914.13,5350 918.58,5354.46
  Top Layer w40: LHS_T.1@348.43,4105 518.43,4275 918.58,4275 ; RHS_T.1@851.85,4105 918.58,4171.73 ; C8.2@916.66,5265 916.66,5288.41 918.58,5290.33 918.58,5354.46 ; C8.2@918.58,5265 L2.2@918.58,4960 918.58,4275 ; J1.2@1020,1943.43 1020,3726.13 953.41,3792.71 P3.2@953.41,3800 953.42,4136.9 918.58,4171.73 ; 918.58,4171.73 918.58,4275
  other v2: 880,4765 880,4800
A2: IC1.A2
A3: IC1.A3
A4: IC1.A4
A5: IC1.A5
A6: IC1.A6
A7: IC1.A7
A8: IC1.A8
A9: IC1.A9
A10: IC1.A10 LHS_V.3 | length 2263.9
  Top Layer w8: v1(396.09,6112.18) 396.09,6020.36 379.29,6003.56 379.29,5905.57 388.63,5896.23 388.63,5885.98 460,5814.61 460,5665 v1(445,5650)
  Top Layer w10: v1(396.09,6112.18) IC1.A10@416.37,6112.18
  Layer 1 w10: v1(396.09,6112.18) 396.48,6112.57 417.02,6112.57 420.64,6116.19 434.63,6116.19 437.18,6113.64 470.05,6113.64 477.16,6120.75 510.03,6120.75 520.58,6110.2 520.58,6091.91 520.28,6091.6 520.28,6073.84 541.66,6052.45 546.23,6052.45 564.71,6033.97 564.71,6016.01 579.32,6001.4 579.32,5989.31 589.32,5979.31 589.32,5895.41 647.75,5836.99
  Layer 2 w8: LHS_V.3@151.57,4500 151.57,5356.57 v1(445,5650)
A11: IC1.A11 RHS_V.3 | length 1860.9
  Top Layer w10: IC1.A11@416.37,6137.77 415.99,6137.77 409.35,6144.41 v1(402.87,6144.41) 378.04,6119.59 378.04,6026.23 358.04,6006.23 358.04,5904.19 372.63,5889.6 372.63,5876.08 393.04,5855.67 393.04,5813.74 427,5779.78 427,5639.33 445.94,5620.39 487.89,5620.39 492.5,5625 v1(535,5625)
  Layer 2 w10: v1(535,5625) 535,4695 655,4575 RHS_V.3@655,4500
A12: IC1.A12
A13: IC1.A13
B1: IC1.B1
B2: IC1.B2
B3: IC1.B3
B4: IC1.B4
B6: IC1.B6
B7: IC1.B7
B8: IC1.B8
B9: IC1.B9
B11: IC1.B11 LHS_T.3 | length 2521.7
  Top Layer w8: IC1.B11@441.96,6137.77 442.37,6137.77 449.23,6144.64 v1(449.64,6144.64)
  Layer 1 w8: LHS_T.3@151.57,4105 193.04,4146.47 ; 193.04,4145 193.04,4146.47 ; 193.04,4148.43 193.04,4146.47 ; v1(449.64,6144.64) 449.23,6145.05 449.23,6164.88 451.4,6167.05 451.4,6210.38 408.04,6253.74 333.04,6253.74 268.04,6188.74 197.73,6188.74 193.04,6184.05 193.04,6153.63 147.28,6107.87 147.28,6092.96 195,6045.24 195,4148.43 193.04,4146.47
B12: IC1.B12
B13: IC1.B13
B14: IC1.B14
C1: IC1.C1
C2: IC1.C2
C3: IC1.C3
C4: IC1.C4
C5: IC1.C5
C6: IC1.C6
C7: IC1.C7
C8: IC1.C8
C9: IC1.C9
C10: IC1.C10
C11: IC1.C11
C12: IC1.C12
C13: IC1.C13
C14: IC1.C14
CS: U4.21 U6.2 | length 286.6
  Top Layer w10: v1(630,2305) 630.54,2305 634.28,2308.74 U4.21@671.38,2308.74
  Bottom Layer w10: U6.2@568.81,2098.31 586.53,2098.31 604.02,2115.79 605.24,2115.79 630,2140.55 v1(630,2305) v1@630.54,2305
CUR_SENSE: U4.18 U5.1 | length 3899
  Top Layer w14: v2(73.04,5618.74) 75.75,5618.74 82.05,5625.04 U5.1@236.86,5625.04 ; v2(605,2185) 606.77,2185 632.71,2210.94 668.07,2210.94 U4.18@671.38,2214.25
  Layer 1 w14: v2(73.04,5618.74) 73.04,5500.73 78,5495.77 78,2712 v2(605,2185)
D1: IC1.D1
D2: IC1.D2
D3: IC1.D3
D4: IC1.D4
D5: IC1.D5
D6: IC1.D6
D7: IC1.D7
D8: IC1.D8 R9.2 | length 403.4
  Top Layer w6: v1(485,6068.1) 485.52,6068.1 492.62,6061 IC1.D8@493.14,6061
  Top Layer w10: R9.2@306.92,6313.88 R9.2@306.92,6313.37 306.92,6227.81 v1(319.32,6215.41)
  Layer 1 w6: v1(319.32,6215.41) 319.32,6164.89 317.41,6162.98 317.41,6114.09 339.23,6092.26 349.77,6092.26 371.59,6070.44 467,6070.44 469.34,6068.1 v1(485,6068.1)
D9: IC1.D9 RHS_T.3 | length 3059.6
  Top Layer w6: v1(485,6093.34) 485.7,6093.34 492.44,6086.59 IC1.D9@493.14,6086.59
  Layer 2 w6: v1(485,6093.34) 485,6225.11 519.89,6260 1030,6260 1055,6235 1055,6155 1050,6150 1005,6150 787.04,5932.04 787.04,5847.94 715.87,5776.76 715.87,4165.87 RHS_T.3@655,4105
D10: IC1.D10 IC3.12 | length 508
  Top Layer w10: v1(180.83,6084.86) 165.67,6100.03 165.67,6115.97 185.58,6135.88 IC3.12@193.3,6135.88 ; IC1.D10@493.14,6112.18 v1(502.58,6102.75) v1@502.58,6102.21
  Layer 1 w10: 499.32,6035.41 503,6039.09 503,6100.79 502.96,6100.84 502.96,6102.37 v1(502.58,6102.75)
  Layer 1 w14: v1(180.83,6084.86) 196.39,6100.41 294.59,6100.41 359.59,6035.41 499.32,6035.41
D11: IC1.D11
D12: IC1.D12
D13: IC1.D13
D14: IC1.D14
D+: IC1.P7 U3.3 U4.27 | length 5128.3
  Top Layer w6: IC1.P7@749.05,6035.41 749.29,6035.41 759.6,6025.1 v1(759.84,6025.1)
  Top Layer w10: U3.3@181.2,1520 v1(260,1520) ; v1(570,2410) 570.38,2410.38 570.38,2447.89 U4.27@570.99,2448.5
  Layer 1 w10: v1(570,2410) 570,2653.88 587.43,2671.31 587.43,3119.01 565.85,3140.59 565.85,3751.16 580,3765.31 580,3784.39 cw(c624.21,3795) 578.75,3795 578.75,5484.44 858.04,5763.74 858.04,5843.74 848.04,5853.74 v3(773.04,5853.74)
  Layer 2 w6: v1(759.84,6025.1) 759.84,5972.39 750.42,5962.98 750.42,5935.43 755.61,5930.24 755.61,5913.98 773.04,5896.56 v3(773.04,5853.74)
  Bottom Layer w10: v1(260,1520) 330,1590 330,2395 345,2410 v1(570,2410)